# Altium PCB Hexapod_PCB.PcbDoc (part 1 of 2)
Units mm, origin at the board's own origin, x right, y up, seen from the top; angles counter-clockwise.
Board outline 100 x 100 mm, 4 copper layers (Top Layer, GND Layer, PWR Layer, Bottom Layer), stack 1.483 mm thick; 251 components, 159 nets, 831 pads, 257 vias.
Unrouted connection lines stored in the file: 253.
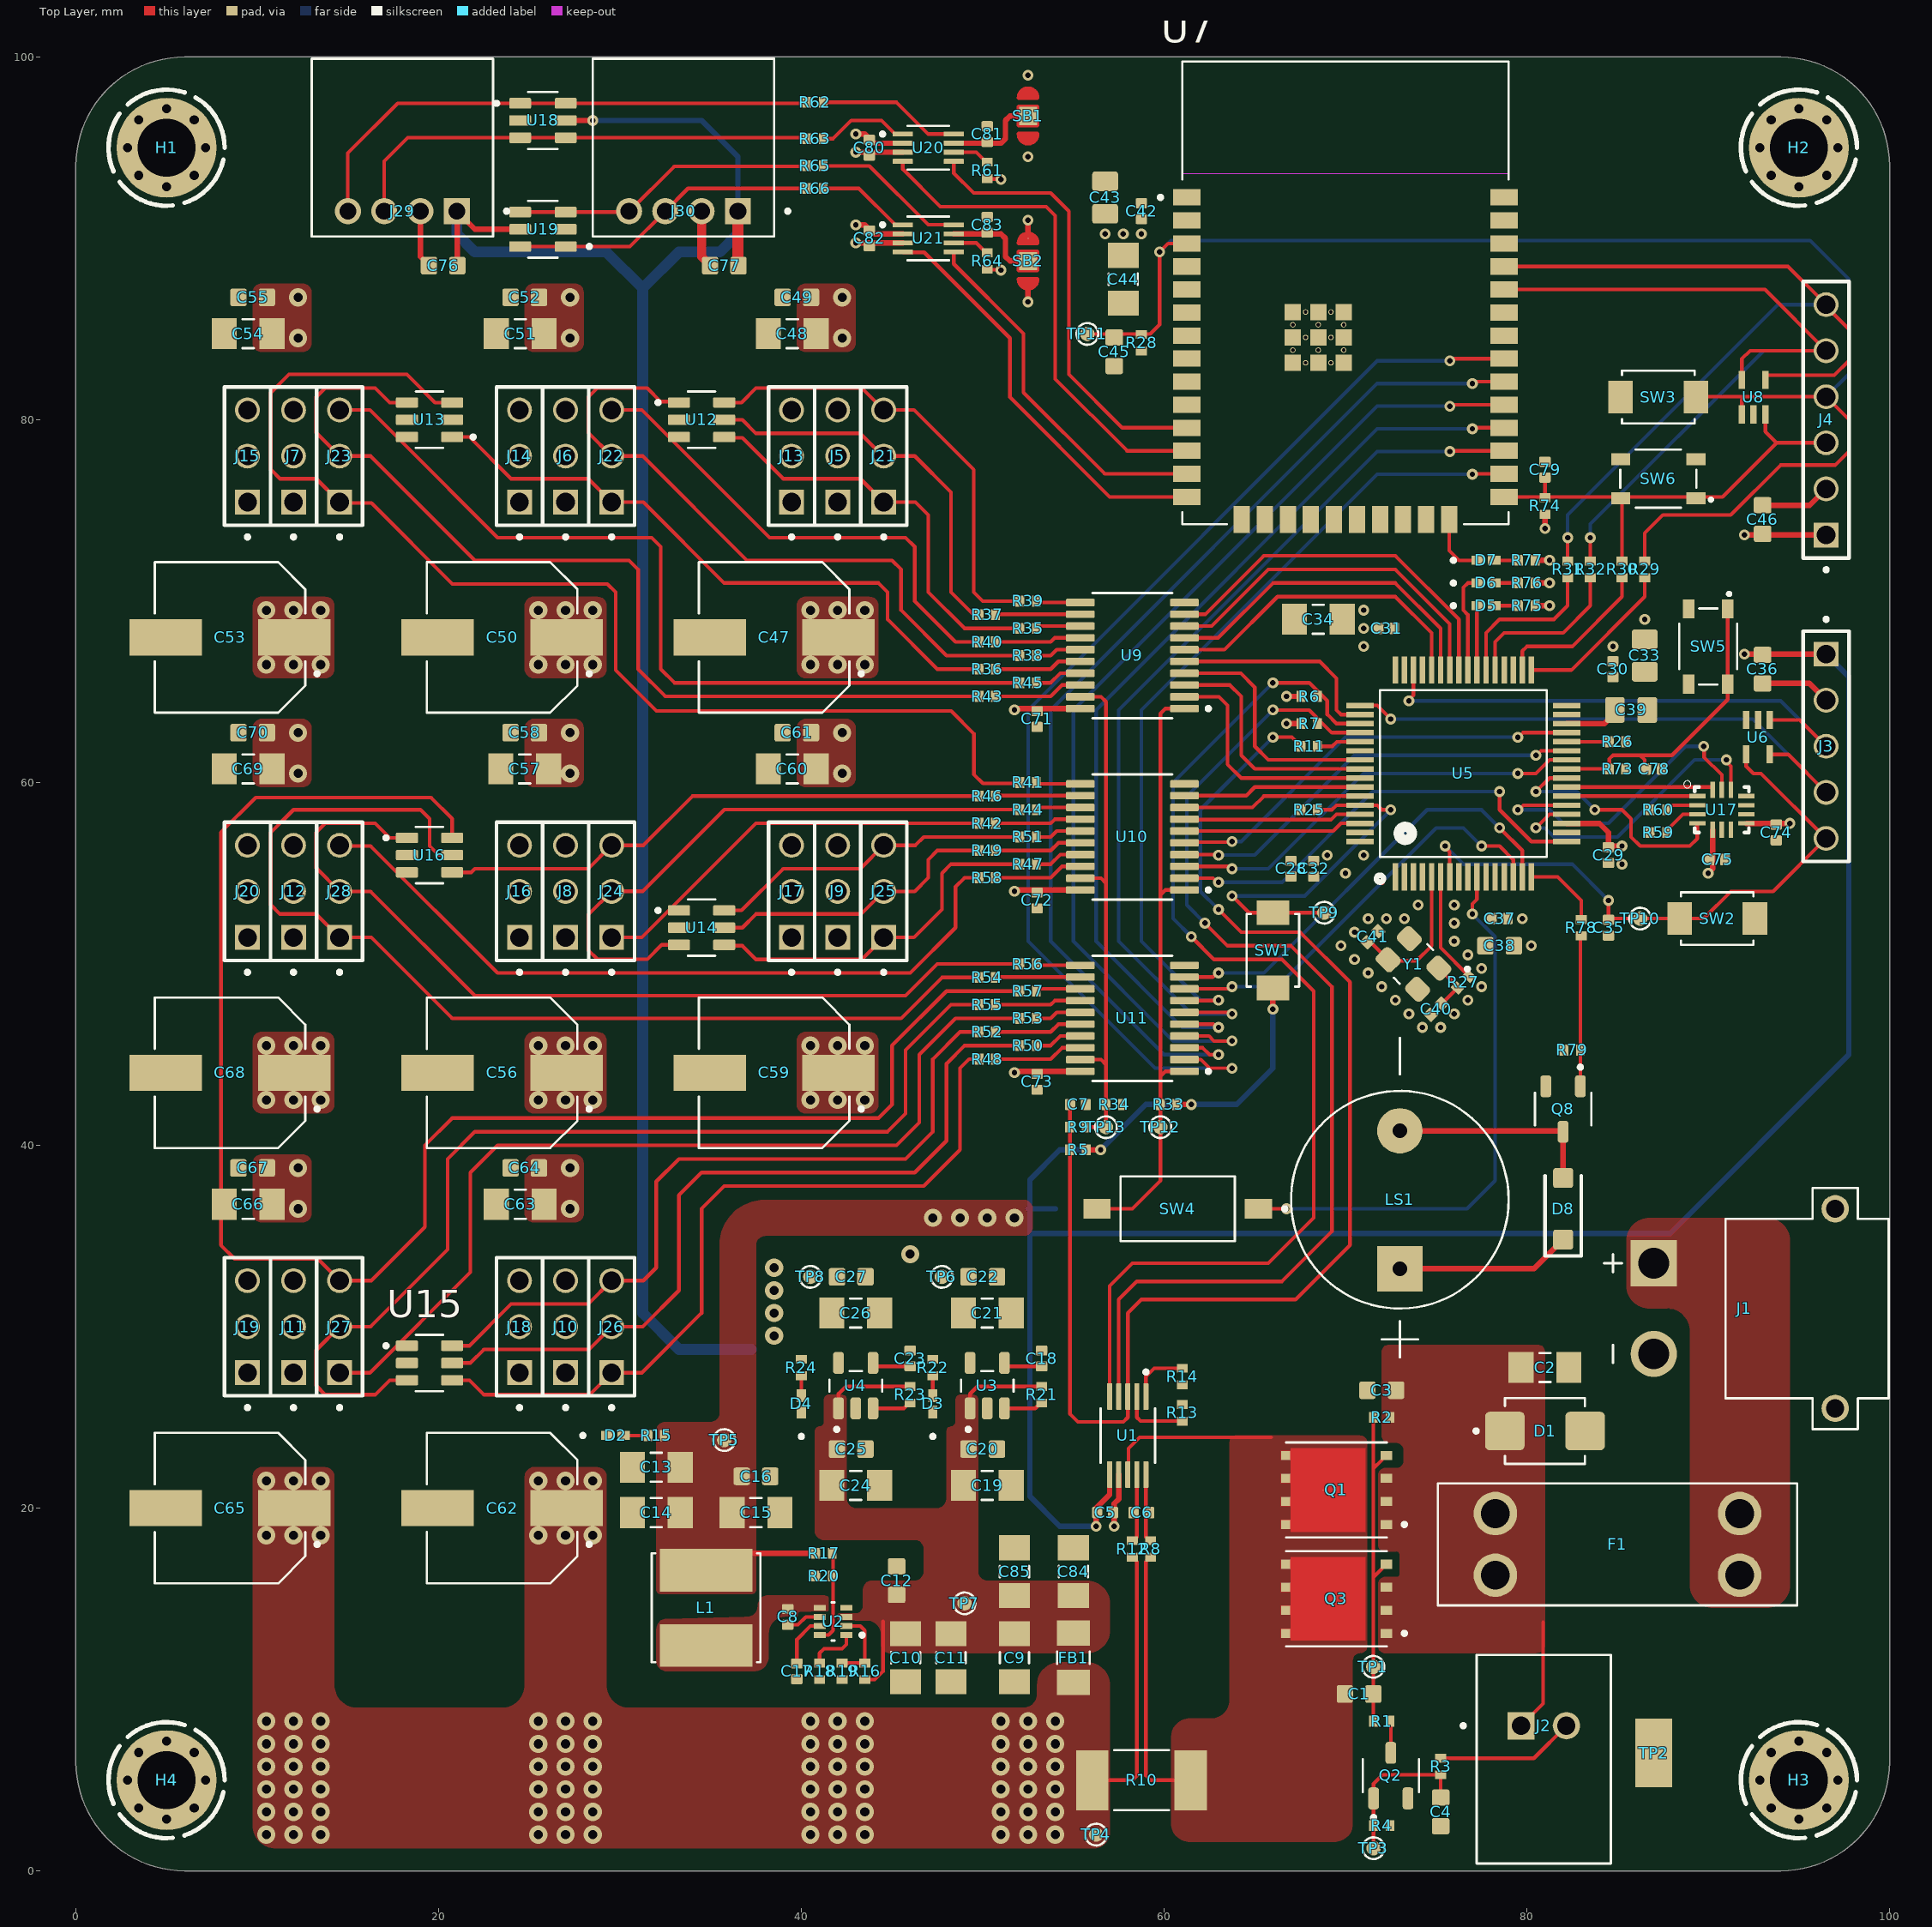
[diagram p0: Top Layer view]
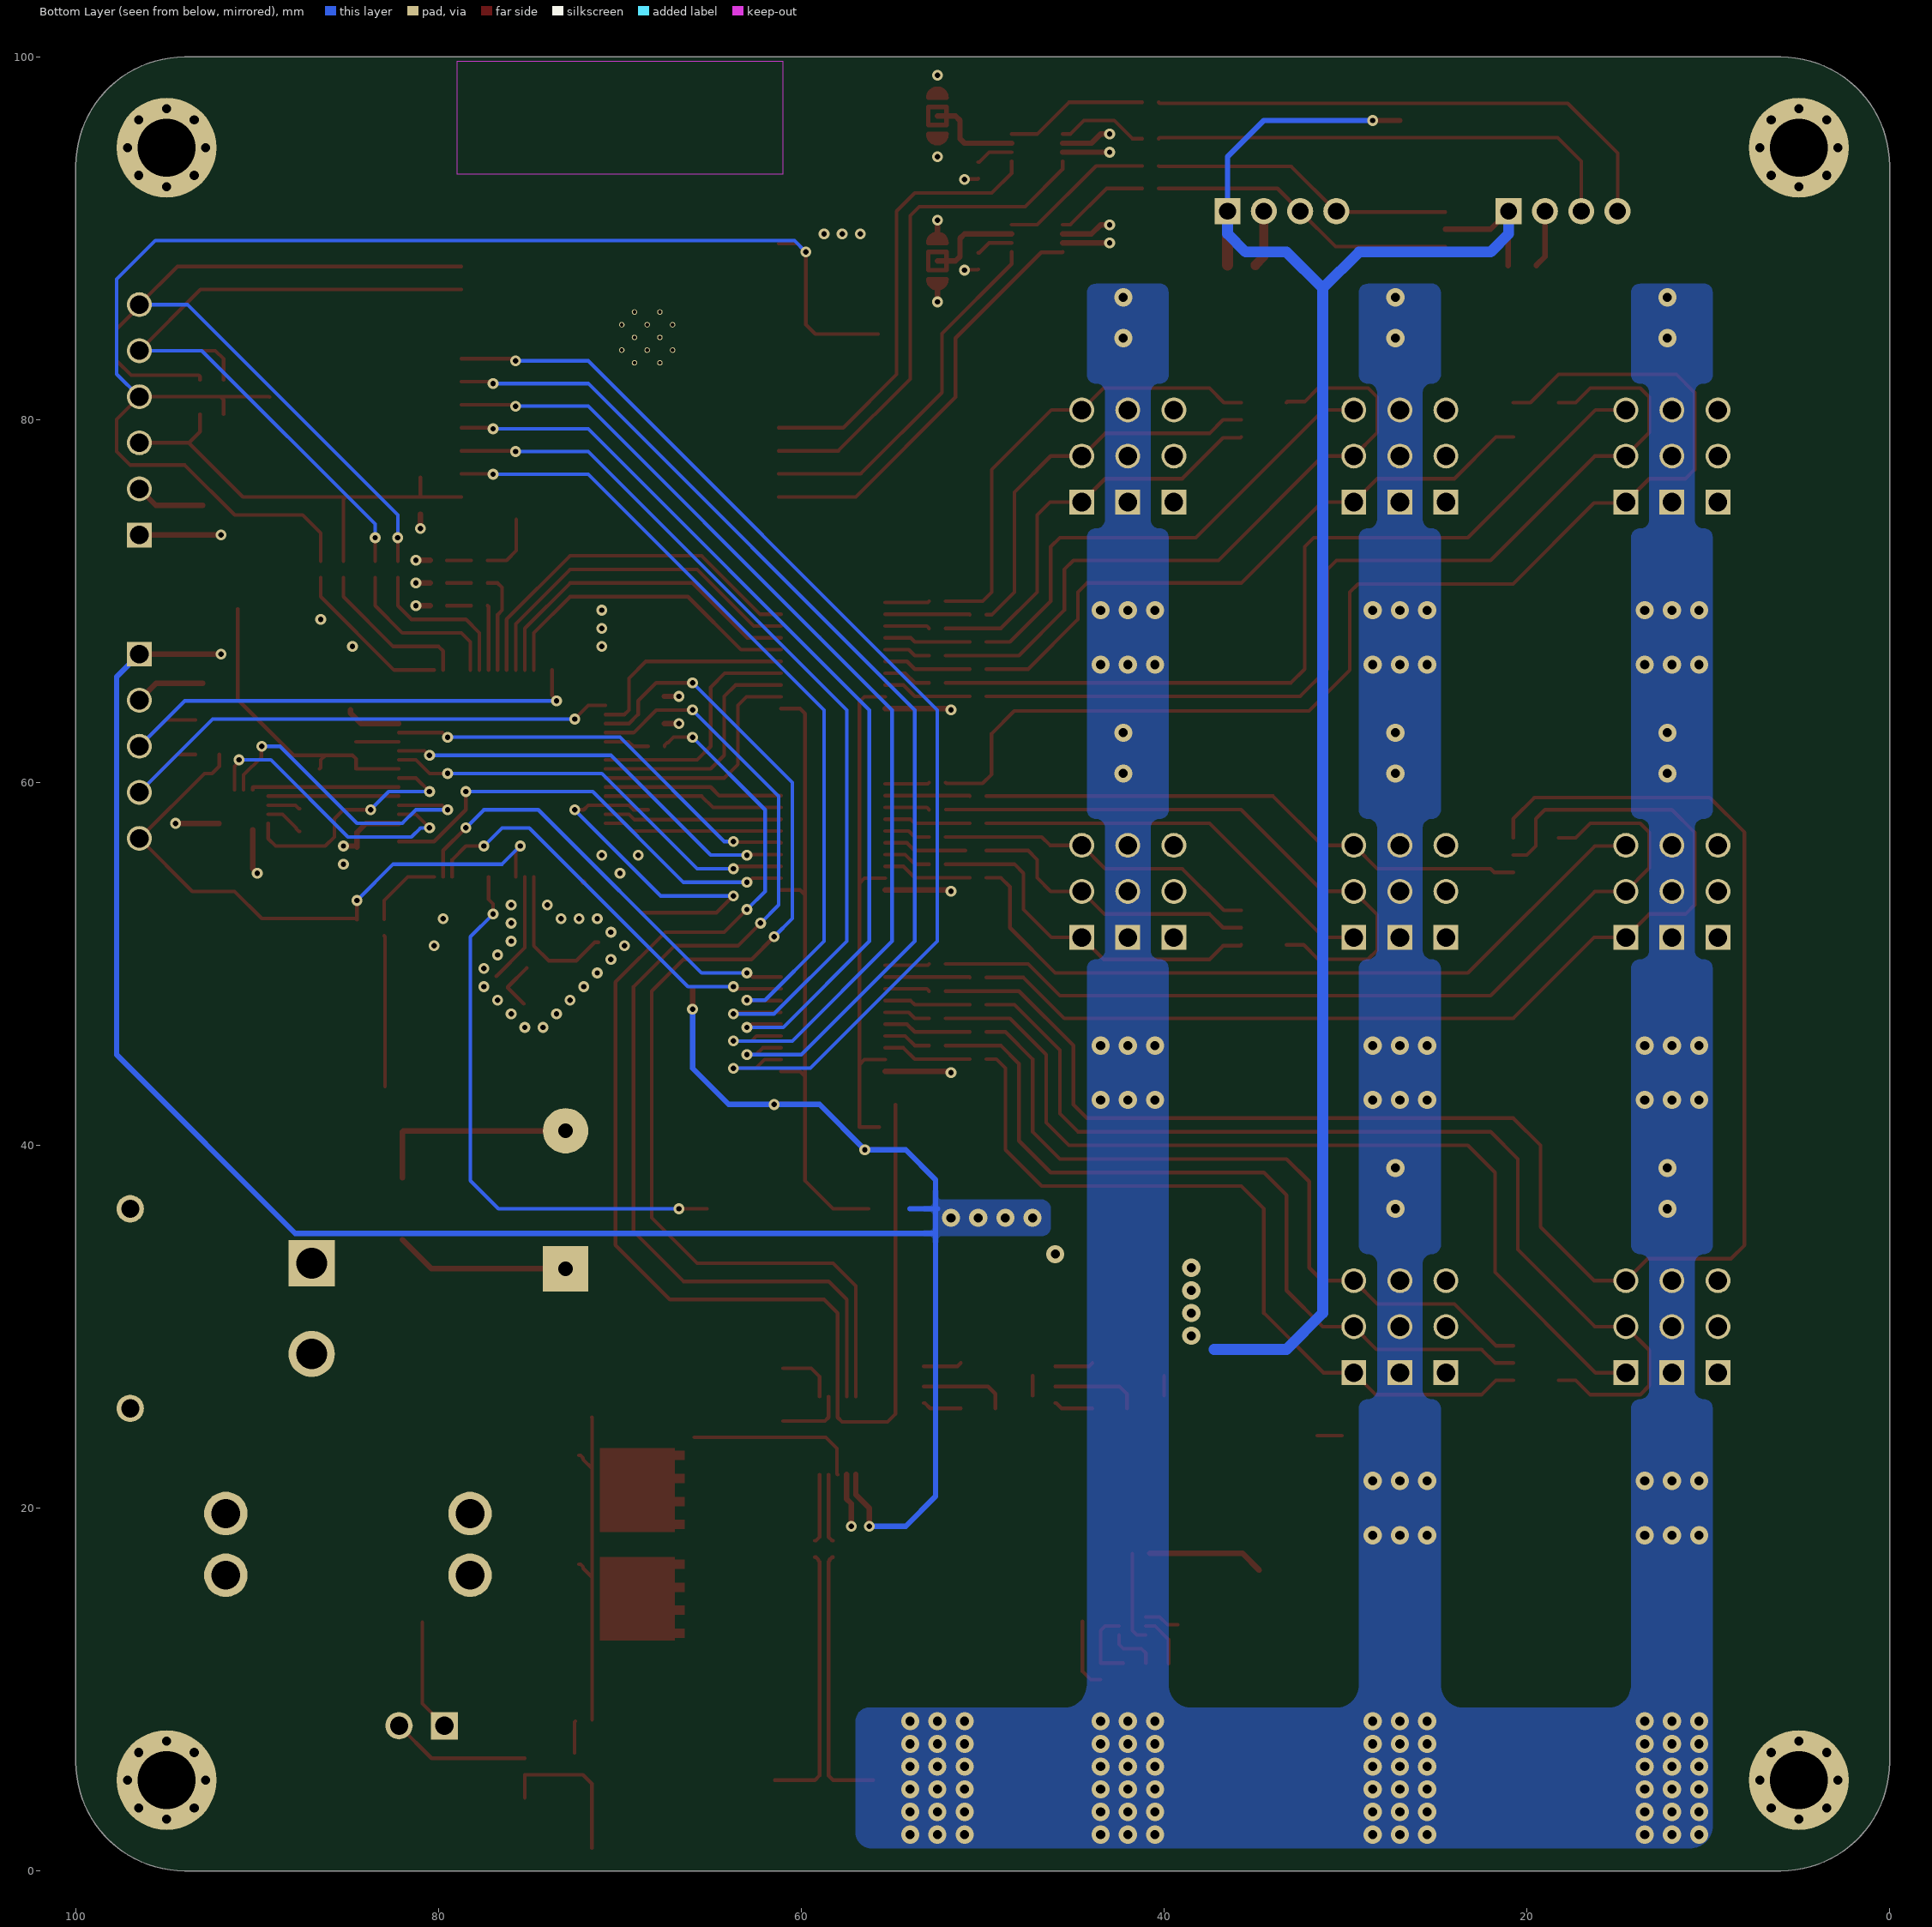
[diagram p1: Bottom Layer view, seen from below]
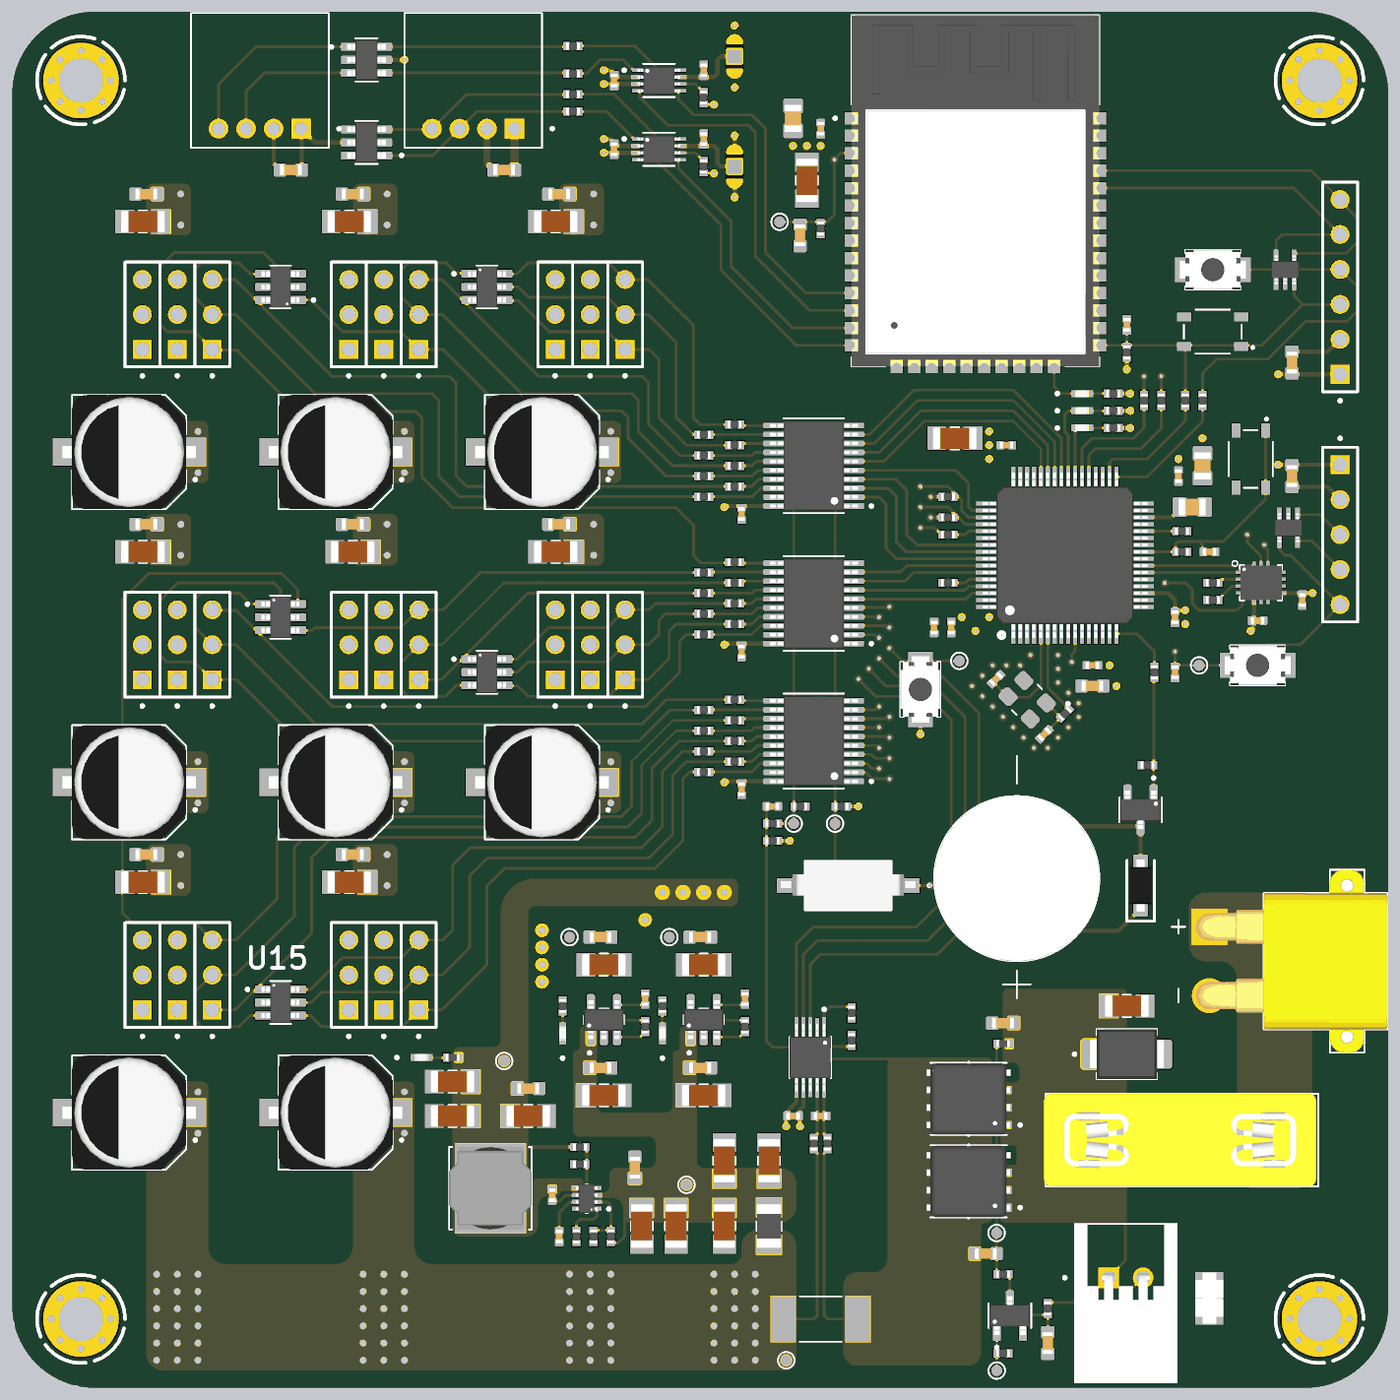
[diagram p3: 3D render of the assembled board from above, using the file's embedded part models]

## Layer stack, top to bottom
Top Solder: solder mask 0.0102, Solder Resist, Dk 3.5
Top Layer: signal copper 0.0356
Dielectric 2: prepreg 0.0711, PP-006, Dk 4.1
GND Layer: signal copper 0.035
Dielectric 1: dielectric 1.2, FR-4, Dk 4.8
PWR Layer: signal copper 0.035
Dielectric 3: prepreg 0.0711, PP-006, Dk 4.1
Bottom Layer: signal copper 0.0356
Bottom Solder: solder mask 0.0102, Solder Resist, Dk 3.5

## Board outline
0,6 0,94 cw(c6,94) 6,100 94,100 cw(c94,94) 100,94 100,6 cw(c94,6) 94,0 6,0 cw(c6,6)

## Design rules (kind name [scope] priority, off if disabled: settings)
Clearance [All] p1: gap=0.15 ignorepadtopadclearanceinfootprint=FALSE
DiffPairsRouting Diff_Sense [InDifferentialPair('SENSE')] p1: maxlimit=0.15 minlimit=0.15 mostfreqgap=0.15 toplayer_minwidth=0.2 toplayer_maxwidth=0.2 toplayer_prefwidth=0.2 midlayer1_minwidth=0.2 midlayer1_maxwidth=0.2 midlayer1_prefwidth=0.2 midlayer2_minwidth=0.2 midlayer2_maxwidth=0.2 midlayer2_prefwidth=0.2 bottomlayer_minwidth=0.2 bottomlayer_maxwidth=0.2 bottomlayer_prefwidth=0.2 maxuncoupledlength=5
DiffPairsRouting [All] p2: maxlimit=0.254 minlimit=0.254 mostfreqgap=0.254 toplayer_minwidth=0.381 toplayer_maxwidth=0.381 toplayer_prefwidth=0.381 midlayer1_minwidth=0.381 midlayer1_maxwidth=0.381 midlayer1_prefwidth=0.381 midlayer2_minwidth=0.381 midlayer2_maxwidth=0.381 midlayer2_prefwidth=0.381 bottomlayer_minwidth=0.381 bottomlayer_maxwidth=0.381 bottomlayer_prefwidth=0.381 maxuncoupledlength=12.7
PlaneConnect [All] p1: planeconnectstyle=Direct reliefexpansion=0.508 reliefentries=4 reliefconductorwidth=0.254 reliefairgap=0.254
PolygonConnect [All] p1: connectstyle=Direct reliefconductorwidth=0.254 reliefentries=4 polygonreliefangle="90 Angle" airgapwidth=0.254
RoutingVias RoutingVias_PWR [InNetClass('PWR')] p1: holewidth=0.5 width=1 viastyle="Through Hole" minholewidth=0.5 minwidth=1 maxholewidth=0.5 maxwidth=1
RoutingVias [All] p2: holewidth=0.3 width=0.6 viastyle="Through Hole" minholewidth=0.3 minwidth=0.6 maxholewidth=0.3 maxwidth=0.6
SilkToSolderMaskClearance [IsPad] p1: minsilkscreentomaskgap=0.1 clearancetoexposedcopper=TRUE
SolderMaskExpansion [All] p1: expansion=0.05 istentingtop=FALSE
SupplyNets "Schematic Supply Nets_7" [InNet('+3V3')] p1: voltage=0.000
SupplyNets "Schematic Supply Nets_6" [InNet('+VBAT_SW')] p2: voltage=0.000
SupplyNets "Schematic Supply Nets_5" [InNet('+VBAT_LOGIC')] p3: voltage=0.000
SupplyNets "Schematic Supply Nets_4" [InNet('+5V_INT')] p4: voltage=0.000
SupplyNets "Schematic Supply Nets_3" [InNet('+VBAT_SYS')] p5: voltage=0.000
SupplyNets "Schematic Supply Nets_2" [InNet('+5V_EXT')] p6: voltage=0.000
SupplyNets "Schematic Supply Nets_1" [InNet('GND')] p7: voltage=0.000
SupplyNets "Schematic Supply Nets" [InNet('+VBAT_F')] p8: voltage=0.000
Width Width_PWR [InNetClass('PWR')] p1: maxlimit=5 minlimit=0.2 preferedwidth=1 minimp=50.000000 maximp=50.000000 favimp=50.000000
Width [InNetClass('All Nets')] p2: maxlimit=0.5 minlimit=0.15 preferedwidth=0.2
27 further rules are at their usual default settings.

## Classes and differential pairs
net class PWR: +3V3 +5V_EXT +5V_INT +VBAT_F +VBAT_SW NetF1_1
component class U_Servo_Signal_Ext: J21 J22 J23 J24 J25 J26 J27 J28 R35 R36 R37 R38 R39 R40 R41 R42 R43 R44 R45 R46 R47 R48 R49 R50 R51 R52 R53 R54 R55 R56 R57 R58 U12 U13 U14 U15 U16
component class U_Servo_Signal_Buf: C71 C72 C73 R33 R34 SW4 TP12 TP13 U9 U10 U11
component class U_Servo_Power: C47 C48 C49 C50 C51 C52 C53 C54 C55 C56 C57 C58 C59 C60 C61 C62 C63 C64 C65 C66 C67 C68 C69 C70 J5 J6 J7 J8 J9 J10 J11 J12 J13 J14 J15 J16 J17 J18 J19 J20
component class U_Serial_Interface_UART: C77 C82 C83 J30 R64 R65 R66 SB2 U19 U21
component class U_Serial_Interface_I2C: C76 C80 C81 J29 R61 R62 R63 SB1 U18 U20
component class U_Power_Input: C1 C2 C3 C4 C5 C6 C7 D1 F1 J1 J2 Q1 Q2 Q3 R1 R2 R3 R4 R5 R6 R7 R8 R9 R10 R11 R12 R13 R14 TP1 TP2 TP3 TP4 U1
component class U_Mechanical: H1 H2 H3 H4
component class U_MCU_STM: C28 C29 C30 C31 C32 C33 C34 C35 C36 C37 C38 C39 C40 C41 J3 R25 R26 R27 SW1 SW2 TP9 TP10 U5 U6 Y1
component class U_MCU_ESP: C42 C43 C44 C45 C46 J4 R28 R29 R30 R31 R32 SW3 TP11 U7 U8
component class U_Input: C78 C79 R73 R74 SW5 SW6
component class U_Indicator: D5 D6 D7 D8 LS1 Q8 R75 R76 R77 R78 R79
component class U_IMU: C74 C75 R59 R60 U17
component class U_Power_Regulators: C8 C9 C10 C11 C12 C13 C14 C15 C16 C17 C18 C19 C20 C21 C22 C23 C24 C25 C26 C27 C84 C85 D2 D3 D4 FB1 L1 R15 R16 R17 R18 R19 R20 R21 R22 R23 R24 TP5 TP6 TP7 TP8 U2 U3 U4

## Components (designator, comment, footprint, x,y, rotation, side; value= is the part's Value field where it differs from the comment)
C1 "N_P_CAP_0603" N_P_CAP_0603 70.75,9.75 r180 top value=330nF
C2 "N_P_CAP_1206" N_P_CAP_1206 81,27.75 r180 top value=10uF
C3 "N_P_CAP_0603" N_P_CAP_0603 72,26.5 r0 top value=100nF
C4 "N_P_CAP_0603" N_P_CAP_0603 75.25,3.25 r90 top value=100nF
C5 "N_P_CAP_0402" N_P_CAP_0402 56.75,19.75 r180 top value=100nF
C6 "N_P_CAP_0402" N_P_CAP_0402 58.75,19.75 r0 top value=100nF
C7 "N_P_CAP_0402" N_P_CAP_0402 55.25,42.25 r180 top value=100nF
C8 "N_P_CAP_0402" N_P_CAP_0402 39.25,14 r270 top value=100nF
C9 "N_P_CAP_1206" N_P_CAP_1206 51.75,11.75 r90 top value=22uF
C10 "N_P_CAP_1206" N_P_CAP_1206 45.75,11.75 r90 top value=10uF
C11 "N_P_CAP_1206" N_P_CAP_1206 48.25,11.75 r90 top value=10uF
C12 "N_P_CAP_0603" N_P_CAP_0603 45.25,16 r270 top value=100nF
C13 "N_P_CAP_1206" N_P_CAP_1206 32,22.25 r0 top value=22uF
C14 "N_P_CAP_1206" N_P_CAP_1206 32,19.75 r0 top value=22uF
C15 "N_P_CAP_1206" N_P_CAP_1206 37.5,19.75 r180 top value=22uF
C16 "N_P_CAP_0603" N_P_CAP_0603 37.5,21.75 r180 top value=100nF
C17 "N_P_CAP_0402" N_P_CAP_0402 39.75,11 r270 top value=33nF
C18 "N_P_CAP_0402" N_P_CAP_0402 53.25,28.25 r270 top value=10nF
C19 "N_P_CAP_1206" N_P_CAP_1206 50.25,21.25 r180 top value=10uF
C20 "N_P_CAP_0603" N_P_CAP_0603 50,23.25 r180 top value=100nF
C21 "N_P_CAP_1206" N_P_CAP_1206 50.25,30.75 r180 top value=10uF
C22 "N_P_CAP_0603" N_P_CAP_0603 50,32.75 r180 top value=100nF
C23 "N_P_CAP_0402" N_P_CAP_0402 46,28.25 r270 top value=10nF
C24 "N_P_CAP_1206" N_P_CAP_1206 43,21.25 r180 top value=10uF
C25 "N_P_CAP_0603" N_P_CAP_0603 42.75,23.25 r180 top value=100nF
C26 "N_P_CAP_1206" N_P_CAP_1206 43,30.75 r180 top value=10uF
C27 "N_P_CAP_0603" N_P_CAP_0603 42.75,32.75 r180 top value=100nF
C28 "N_P_CAP_0402" N_P_CAP_0402 67,55.25 r270 top value=100nF
C29 "N_P_CAP_0402" N_P_CAP_0402 84.5,56 r90 top value=100nF
C30 "N_P_CAP_0402" N_P_CAP_0402 84.75,66.25 r90 top value=100nF
C31 "N_P_CAP_0402" N_P_CAP_0402 72.25,68.5 r180 top value=100nF
C32 "N_P_CAP_0402" N_P_CAP_0402 68.25,55.25 r270 top value=100nF
C33 "N_P_CAP_0805" N_P_CAP_0805 86.5,67 r90 top value=4.7uF
C34 "N_P_CAP_1206" N_P_CAP_1206 68.5,69 r0 top value=22uF
C35 "N_P_CAP_0402" N_P_CAP_0402 84.5,52 r90 top value=100nF
C36 "N_P_CAP_0603" N_P_CAP_0603 93,66.25 r90 top value=100nF
C37 "N_P_CAP_0402" N_P_CAP_0402 78.5,52.5 r0 top value=100nF
C38 "N_P_CAP_0603" N_P_CAP_0603 78.5,51 r0 top value=1uF
C39 "N_P_CAP_0805" N_P_CAP_0805 85.75,64 r180 top value=4.7uF
C40 "N_P_CAP_0402" N_P_CAP_0402 75,47.5 r45 top value=20pF
C41 "N_P_CAP_0402" N_P_CAP_0402 71.5,51.5 r225 top value=20pF
C42 "N_P_CAP_0402" N_P_CAP_0402 58.75,91.5 r270 top value=100nF
C43 "N_P_CAP_0805" N_P_CAP_0805 56.75,92.25 r270 top value=4.7uF
C44 "N_P_CAP_1206" N_P_CAP_1206 57.75,87.75 r90 top value=22uF
C45 "N_P_CAP_0603" N_P_CAP_0603 57.25,83.75 r90 top value=1uF
C46 "N_P_CAP_0603" N_P_CAP_0603 93,74.5 r270 top value=100nF
C47 "P_CAP_8X10.2" P_CAP_8X10.2 38.5,68 r180 top value=470uF
C48 "N_P_CAP_1206" N_P_CAP_1206 39.5,84.75 r0 top value=10uF
C49 "N_P_CAP_0603" N_P_CAP_0603 39.75,86.75 r0 top value=100nF
C50 "P_CAP_8X10.2" P_CAP_8X10.2 23.5,68 r180 top value=470uF
C51 "N_P_CAP_1206" N_P_CAP_1206 24.5,84.75 r0 top value=10uF
C52 "N_P_CAP_0603" N_P_CAP_0603 24.75,86.75 r0 top value=100nF
C53 "P_CAP_8X10.2" P_CAP_8X10.2 8.5,68 r180 top value=470uF
C54 "N_P_CAP_1206" N_P_CAP_1206 9.5,84.75 r0 top value=10uF
C55 "N_P_CAP_0603" N_P_CAP_0603 9.75,86.75 r0 top value=100nF
C56 "P_CAP_8X10.2" P_CAP_8X10.2 23.5,44 r180 top value=470uF
C57 "N_P_CAP_1206" N_P_CAP_1206 24.75,60.75 r0 top value=10uF
C58 "N_P_CAP_0603" N_P_CAP_0603 24.75,62.75 r0 top value=100nF
C59 "P_CAP_8X10.2" P_CAP_8X10.2 38.5,44 r180 top value=470uF
C60 "N_P_CAP_1206" N_P_CAP_1206 39.5,60.75 r0 top value=10uF
C61 "N_P_CAP_0603" N_P_CAP_0603 39.75,62.75 r0 top value=100nF
C62 "P_CAP_8X10.2" P_CAP_8X10.2 23.5,20 r180 top value=470uF
C63 "N_P_CAP_1206" N_P_CAP_1206 24.5,36.75 r0 top value=10uF
C64 "N_P_CAP_0603" N_P_CAP_0603 24.75,38.75 r0 top value=100nF
C65 "P_CAP_8X10.2" P_CAP_8X10.2 8.5,20 r180 top value=470uF
C66 "N_P_CAP_1206" N_P_CAP_1206 9.5,36.75 r0 top value=10uF
C67 "N_P_CAP_0603" N_P_CAP_0603 9.75,38.75 r0 top value=100nF
C68 "P_CAP_8X10.2" P_CAP_8X10.2 8.5,44 r180 top locked value=470uF
C69 "N_P_CAP_1206" N_P_CAP_1206 9.5,60.75 r0 top value=10uF
C70 "N_P_CAP_0603" N_P_CAP_0603 9.75,62.75 r0 top value=100nF
C71 "N_P_CAP_0402" N_P_CAP_0402 53,63.5 r90 top value=100nF
C72 "N_P_CAP_0402" N_P_CAP_0402 53,53.5 r90 top value=100nF
C73 "N_P_CAP_0402" N_P_CAP_0402 53,43.5 r90 top value=100nF
C74 "N_P_CAP_0402" N_P_CAP_0402 93.75,57.25 r90 top value=100nF
C75 "N_P_CAP_0402" N_P_CAP_0402 90.5,55.75 r180 top value=100nF
C76 "N_P_CAP_0603" N_P_CAP_0603 20.25,88.5 r0 top value=100nF
C77 "N_P_CAP_0603" N_P_CAP_0603 35.75,88.5 r0 top value=100nF
C78 "N_P_CAP_0402" N_P_CAP_0402 87,60.75 r180 top value=100nF
C79 "N_P_CAP_0402" N_P_CAP_0402 81,77.25 r270 top value=100nF
C80 "N_P_CAP_0402" N_P_CAP_0402 43.75,95 r270 top value=100nF
C81 "N_P_CAP_0402" N_P_CAP_0402 50.25,95.75 r270 top value=100nF
C82 "N_P_CAP_0402" N_P_CAP_0402 43.75,90 r270 top value=100nF
C83 "N_P_CAP_0402" N_P_CAP_0402 50.25,90.75 r270 top value=100nF
C84 "N_P_CAP_1206" N_P_CAP_1206 55,16.5 r270 top value=22uF
C85 "N_P_CAP_1206" N_P_CAP_1206 51.75,16.5 r270 top value=22uF
D1 "DO-214AA" DO-214AA 81,24.25 r0 top
D2 "LED_0402" LED_0402 29.75,24 r0 top
D3 "LED_0402" LED_0402 47.25,25.75 r90 top
D4 "LED_0402" LED_0402 40,25.75 r90 top
D5 "LED_0402" LED_0402 77.75,69.75 r0 top
D6 "LED_0402" LED_0402 77.75,71 r0 top
D7 "LED_0402" LED_0402 77.75,72.25 r0 top
D8 "SOD-123F" SOD-123F 82,36.5 r90 top
F1 "FUSE_HOLDER_3557-20" FUSE_HOLDER_3557-20 85,18 r180 top
FB1 "FB_1206" FB_1206 55,11.75 r90 top value=120Ω@100MHz
H1 "MOUNTING_HOLE_M3" MOUNTING_HOLE_M3 5,95 r0 top
H2 "MOUNTING_HOLE_M3" MOUNTING_HOLE_M3 95,95 r0 top
H3 "MOUNTING_HOLE_M3" MOUNTING_HOLE_M3 95,5 r0 top
H4 "MOUNTING_HOLE_M3" MOUNTING_HOLE_M3 5,5 r0 top
J1 "AMASS_XT30PW-M" AMASS_XT30PW-M 97,31 r270 top locked
J2 "CONN_JST_XH_1x02_P2.50mm_TH_RA" CONN_JST_XH_1x02_P2.50mm_TH_RA 80.932,8 r0 top locked
J3 "PIN_HEADER_1X5_2.54_VERTICAL" PIN_HEADER_1X5_2.54_VERTICAL 96.5,62 r90 top
J4 "PIN_HEADER_1X6_2.54_VERTICAL" PIN_HEADER_1X6_2.54_VERTICAL 96.5,80 r270 top
J5 "PIN_HEADER_1X3_2.54_VERTICAL" PIN_HEADER_1X3_2.54_VERTICAL 42,78 r270 top
J6 "PIN_HEADER_1X3_2.54_VERTICAL" PIN_HEADER_1X3_2.54_VERTICAL 27,78 r270 top
J7 "PIN_HEADER_1X3_2.54_VERTICAL" PIN_HEADER_1X3_2.54_VERTICAL 12,78 r270 top
J8 "PIN_HEADER_1X3_2.54_VERTICAL" PIN_HEADER_1X3_2.54_VERTICAL 27,54 r270 top
J9 "PIN_HEADER_1X3_2.54_VERTICAL" PIN_HEADER_1X3_2.54_VERTICAL 42,54 r270 top
J10 "PIN_HEADER_1X3_2.54_VERTICAL" PIN_HEADER_1X3_2.54_VERTICAL 27,30 r270 top
J11 "PIN_HEADER_1X3_2.54_VERTICAL" PIN_HEADER_1X3_2.54_VERTICAL 12,30 r270 top
J12 "PIN_HEADER_1X3_2.54_VERTICAL" PIN_HEADER_1X3_2.54_VERTICAL 12,54 r270 top
J13 "PIN_HEADER_1X3_2.54_VERTICAL" PIN_HEADER_1X3_2.54_VERTICAL 39.46,78 r270 top
J14 "PIN_HEADER_1X3_2.54_VERTICAL" PIN_HEADER_1X3_2.54_VERTICAL 24.46,78 r270 top
J15 "PIN_HEADER_1X3_2.54_VERTICAL" PIN_HEADER_1X3_2.54_VERTICAL 9.46,78 r270 top
J16 "PIN_HEADER_1X3_2.54_VERTICAL" PIN_HEADER_1X3_2.54_VERTICAL 24.46,54 r270 top
J17 "PIN_HEADER_1X3_2.54_VERTICAL" PIN_HEADER_1X3_2.54_VERTICAL 39.46,54 r270 top
J18 "PIN_HEADER_1X3_2.54_VERTICAL" PIN_HEADER_1X3_2.54_VERTICAL 24.46,30 r270 top
J19 "PIN_HEADER_1X3_2.54_VERTICAL" PIN_HEADER_1X3_2.54_VERTICAL 9.46,30 r270 top
J20 "PIN_HEADER_1X3_2.54_VERTICAL" PIN_HEADER_1X3_2.54_VERTICAL 9.46,54 r270 top
J21 "PIN_HEADER_1X3_2.54_VERTICAL" PIN_HEADER_1X3_2.54_VERTICAL 44.54,78 r270 top
J22 "PIN_HEADER_1X3_2.54_VERTICAL" PIN_HEADER_1X3_2.54_VERTICAL 29.54,78 r270 top
J23 "PIN_HEADER_1X3_2.54_VERTICAL" PIN_HEADER_1X3_2.54_VERTICAL 14.54,78 r270 top
J24 "PIN_HEADER_1X3_2.54_VERTICAL" PIN_HEADER_1X3_2.54_VERTICAL 29.54,54 r270 top
J25 "PIN_HEADER_1X3_2.54_VERTICAL" PIN_HEADER_1X3_2.54_VERTICAL 44.54,54 r270 top
J26 "PIN_HEADER_1X3_2.54_VERTICAL" PIN_HEADER_1X3_2.54_VERTICAL 29.54,30 r270 top
J27 "PIN_HEADER_1X3_2.54_VERTICAL" PIN_HEADER_1X3_2.54_VERTICAL 14.54,30 r270 top
J28 "PIN_HEADER_1X3_2.54_VERTICAL" PIN_HEADER_1X3_2.54_VERTICAL 14.54,54 r270 top
J29 "CONN_HY2.0_1x04_P2.00mm_TH_RA" CONN_HY2.0_1x04_P2.00mm_TH_RA 18,95 r180 top
J30 "CONN_HY2.0_1x04_P2.00mm_TH_RA" CONN_HY2.0_1x04_P2.00mm_TH_RA 33.5,95 r180 top
L1 "INDUCTOR_SRN6045TA-3R3Y" INDUCTOR_SRN6045TA-3R3Y 34.75,14.5 r90 top value=3.3uH
LS1 "BUZ_THT_D12.0_P7.6" BUZ_THT_D12.0_P7.6 73,37 r90 top locked
Q1 "DFN5X6" DFN5X6 69.5,21 r180 top locked
Q2 "SOT95P280X125-3N" SOT95P280X125-3N 72.5,5.25 r90 top
Q3 "DFN5X6" DFN5X6 69.5,15 r180 top locked
Q8 "SOT95P280X125-3N" SOT95P280X125-3N 82,42 r270 top
R1 "RES_0402" RES_0402 72,8.25 r0 top value=10kOhm
R2 "RES_0402" RES_0402 72,25 r180 top value=100kOhm
R3 "RES_0402" RES_0402 75.25,5.75 r270 top value=10kOhm
R4 "RES_0402" RES_0402 72,2.5 r0 top value=100kOhm
R5 "RES_0402" RES_0402 55.25,39.75 r0 top value=10kOhm
R6 "RES_0402" RES_0402 68,64.75 r180 top value=10kOhm
R7 "RES_0402" RES_0402 68,63.25 r180 top value=10kOhm
R8 "RES_0402" RES_0402 59.25,17.75 r270 top value=10Ohm
R9 "RES_0402" RES_0402 55.25,41 r180 top value=330Ohm
R10 "SHUNT_RES_2512" SHUNT_RES_2512 58.75,5 r0 top value=1mOhm
R11 "RES_0402" RES_0402 68,62 r0 top value=330Ohm
R12 "RES_0402" RES_0402 58.25,17.75 r270 top value=10Ohm
R13 "RES_0402" RES_0402 61,25.25 r90 top value=100kOhm
R14 "RES_0402" RES_0402 61,27.25 r270 top value=100kOhm
R15 "RES_0402" RES_0402 32,24 r0 top value=10kOhm
R16 "RES_0402" RES_0402 43.5,11 r270 top value=590kOhm
R17 "RES_0402" RES_0402 41.25,17.5 r180 top value=30.9kOhm
R18 "RES_0402" RES_0402 41,11 r90 top value=0Ohm
R19 "RES_0402" RES_0402 42.25,11 r90 top value=196kOhm
R20 "RES_0402" RES_0402 41.25,16.25 r0 top value=10kOhm
R21 "RES_0402" RES_0402 53.25,26.25 r270 top value=100kOhm
R22 "RES_0402" RES_0402 47.25,27.75 r90 top value=10kOhm
R23 "RES_0402" RES_0402 46,26.25 r270 top value=100kOhm
R24 "RES_0402" RES_0402 40,27.75 r90 top value=10kOhm
R25 "RES_0402" RES_0402 68,58.5 r180 top value=10kOhm
R26 "RES_0402" RES_0402 85,62.25 r0 top value=10kOhm
R27 "RES_0402" RES_0402 76.5,49 r45 top value=0Ohm
R28 "RES_0402" RES_0402 58.75,84.25 r90 top value=10kOhm
R29 "RES_0402" RES_0402 86.5,71.75 r270 top value=330Ohm
R30 "RES_0402" RES_0402 85.25,71.75 r90 top value=330Ohm
R31 "RES_0402" RES_0402 82.25,71.75 r270 top value=330Ohm
R32 "RES_0402" RES_0402 83.5,71.75 r270 top value=330Ohm
R33 "RES_0402" RES_0402 60.25,42.25 r180 top value=10kOhm
R34 "RES_0402" RES_0402 57.25,42.25 r0 top value=10kOhm
R35 "RES_0402" RES_0402 52.5,68.5 r0 top value=330Ohm
R36 "RES_0402" RES_0402 50.25,66.25 r0 top value=330Ohm
R37 "RES_0402" RES_0402 50.25,69.25 r0 top value=330Ohm
R38 "RES_0402" RES_0402 52.5,67 r0 top value=330Ohm
R39 "RES_0402" RES_0402 52.5,70 r0 top value=330Ohm
R40 "RES_0402" RES_0402 50.25,67.75 r0 top value=330Ohm
R41 "RES_0402" RES_0402 52.5,60 r0 top value=330Ohm
R42 "RES_0402" RES_0402 50.25,57.75 r0 top value=330Ohm
R43 "RES_0402" RES_0402 50.25,64.75 r0 top value=330Ohm
R44 "RES_0402" RES_0402 52.5,58.5 r0 top value=330Ohm
R45 "RES_0402" RES_0402 52.5,65.5 r0 top value=330Ohm
R46 "RES_0402" RES_0402 50.25,59.25 r0 top value=330Ohm
R47 "RES_0402" RES_0402 52.5,55.5 r0 top value=330Ohm
R48 "RES_0402" RES_0402 50.25,44.75 r0 top value=330Ohm
R49 "RES_0402" RES_0402 50.25,56.25 r0 top value=330Ohm
R50 "RES_0402" RES_0402 52.5,45.5 r0 top value=330Ohm
R51 "RES_0402" RES_0402 52.5,57 r0 top value=330Ohm
R52 "RES_0402" RES_0402 50.25,46.25 r0 top value=330Ohm
R53 "RES_0402" RES_0402 52.5,47 r0 top value=330Ohm
R54 "RES_0402" RES_0402 50.25,49.25 r0 top value=330Ohm
R55 "RES_0402" RES_0402 50.25,47.75 r0 top value=330Ohm
R56 "RES_0402" RES_0402 52.5,50 r0 top value=330Ohm
R57 "RES_0402" RES_0402 52.5,48.5 r0 top value=330Ohm
R58 "RES_0402" RES_0402 50.25,54.75 r0 top value=330Ohm
R59 "RES_0402" RES_0402 87.25,57.25 r180 top value=100kOhm
R60 "RES_0402" RES_0402 87.25,58.5 r180 top value=100kOhm
R61 "RES_0402" RES_0402 50.25,93.75 r90 top value=100kOhm
R62 "RES_0402" RES_0402 40.75,97.5 r180 top value=330Ohm
R63 "RES_0402" RES_0402 40.75,95.5 r0 top value=330Ohm
R64 "RES_0402" RES_0402 50.25,88.75 r90 top value=100kOhm
R65 "RES_0402" RES_0402 40.75,94 r180 top value=330Ohm
R66 "RES_0402" RES_0402 40.75,92.75 r180 top value=330Ohm
R73 "RES_0402" RES_0402 85,60.75 r180 top value=100kOhm
R74 "RES_0402" RES_0402 81,75.25 r90 top value=10kOhm
R75 "RES_0402" RES_0402 80,69.75 r180 top value=10kOhm
R76 "RES_0402" RES_0402 80,71 r180 top value=10kOhm
R77 "RES_0402" RES_0402 80,72.25 r180 top value=10kOhm
R78 "RES_0402" RES_0402 83,52 r90 top value=330Ohm
R79 "RES_0402" RES_0402 82.5,45.25 r0 top value=100kOhm
SB1 "SOLDERING_BRIDGE_3P" SOLDERING_BRIDGE_3P#1 52.5,96.75 r90 top
SB2 "SOLDERING_BRIDGE_3P" SOLDERING_BRIDGE_3P#2 52.5,88.75 r90 top
SW1 "SW_TS-1088-AR02016" SW_TS-1088-AR02016 66,50.75 r90 top
SW2 "SW_TS-1088-AR02016" SW_TS-1088-AR02016 90.5,52.5 r180 top
SW3 "SW_TS-1088-AR02016" SW_TS-1088-AR02016 87.25,81.25 r0 top
SW4 "SW_KAE01SGGT" SW_KAE01SGGT 60.75,36.5 r180 top
SW5 "SW_SKRPACE010" SW_SKRPACE010 90,67.5 r270 top
SW6 "SW_SKRPACE010" SW_SKRPACE010 87.25,76.75 r180 top
TP1 "TP_0.8MM" TP_0.8MM 71.535,11.25 r90 top
TP2 "TP_KEYSTONE_5019" TP_KEYSTONE_5019 87,6.5 r90 top
TP3 "TP_0.8MM" TP_0.8MM 71.55,1.25 r90 top
TP4 "TP_0.8MM" TP_0.8MM 56.25,2 r270 top
TP5 "TP_0.8MM" TP_0.8MM 35.75,23.75 r180 top
TP6 "TP_0.8MM" TP_0.8MM 47.75,32.75 r90 top
TP7 "TP_0.8MM" TP_0.8MM 49,14.75 r90 top
TP8 "TP_0.8MM" TP_0.8MM 40.5,32.75 r90 top
TP9 "TP_0.8MM" TP_0.8MM 68.825,52.825 r90 top
TP10 "TP_0.8MM" TP_0.8MM 86.25,52.5 r90 top
TP11 "TP_0.8MM" TP_0.8MM 55.767,84.733 r90 top
TP12 "TP_0.8MM" TP_0.8MM 59.795,41 r90 top
TP13 "TP_0.8MM" TP_0.8MM 56.795,41 r90 top
U1 "INA226AIDGSR" SOP50P490X110-10N 58,24 r270 top
U2 "TPS62933DRLR" SOTFL50P160X60-8N 41.75,13.75 r180 top
U3 "LP2985-50DBVR" SOT95P280X145-5N 50.25,26.75 r90 top
U4 "LP2985-50DBVR" SOT95P280X145-5N 43,26.75 r90 top
U5 "STM32F411RET6" QFP50P1200X1200X160-64N 76.5,60.5 r90 top locked
U6 "ESDALC6V1W5" SOT323-5L 92.75,62.5 r0 top
U7 "ESP32-WROOM-32E_(4MB)" XCVR_ESP32-WROOM-32E_(4MB) 70,87 r0 top
U8 "ESDALC6V1W5" SOT323-5L 92.5,81.25 r180 top
U9 "SN74AHCT541PWR" SOP65P640X120-20N 58.25,67 r180 top
U10 "SN74AHCT541PWR" SOP65P640X120-20N 58.25,57 r180 top
U11 "SN74AHCT541PWR" SOP65P640X120-20N 58.25,47 r180 top
U12 "SMS12CT1" SOT95P275X110-6N 34.5,80 r0 top
U13 "SMS12CT1" SOT95P275X110-6N 19.5,80 r180 top
U14 "SMS12CT1" SOT95P275X110-6N 34.5,52 r0 top
U15 "SMS12CT1" SOT95P275X110-6N 19.5,28 r0 top
U16 "SMS12CT1" SOT95P275X110-6N 19.5,56 r0 top
U17 "LSM6DS3TR-C" LGA-14-2.5X3MM 90.75,58.5 r0 top
U18 "USBLC6-2SC6" SOT95P280X145-6N 25.75,96.5 r0 top
U19 "USBLC6-2SC6" SOT95P280X145-6N 25.75,90.5 r180 top
U20 "TXS0102DCUR" SOP50P310X90-8N 47,95 r0 top
U21 "TXS0102DCUR" SOP50P310X90-8N 47,90 r0 top
Y1 "SMD3225-4P" SMD3225-4P 73.75,50 r135 top

## Footprints (in the part's own frame and the unit in brackets; to place one, negate y for a bottom-side part, rotate by r counter-clockwise, add the part's x,y. Pads: shape width x height; smd on the part's side, far side on the other; paste and mask are expansions set on the pad)
AMASS_XT30PW-M [mm]
  rect 2.55x2.55 / inner round 2.55 / far side rect 2.55x2.55 hole 1.7: 1(-2.5,-10)
  round 2.55 hole 1.7: 2(2.5,-10)
  round 1.508 hole 1: 3(-5.5,0) 4(5.5,0)
  silkscreen extent -6.65,-12.75 6.65,2.95, body extent -6.65,-11 6.65,2.95, height 5
BUZ_THT_D12.0_P7.6 [mm]
  round 2.5 hole 0.8: N(3.8,0)
  rect 2.5x2.5 / inner round 2.5 / far side rect 2.5x2.5 hole 0.8: P(-3.8,0)
  silkscreen extent -8.69,-6 8.92,6, body extent -6,-6 6,6, height 9.51
CONN_HY2.0_1x04_P2.00mm_TH_RA [mm]
  rect 1.438x1.438 / inner round 1.438 / far side rect 1.438x1.438 hole 0.93: 1(-3,3.5)
  round 1.438 hole 0.93: 2(-1,3.5) 3(1,3.5) 4(3,3.5)
  silkscreen extent -5.85,-4.9 5,4.9
CONN_JST_XH_1x02_P2.50mm_TH_RA [mm]
  rect 1.508x1.508 / inner round 1.508 / far side rect 1.508x1.508 hole 1: 1(-1.25,0)
  round 1.508 hole 1: 2(1.25,0)
  silkscreen extent -4.54,-7.6 3.7,3.9, body extent -3.7,-7.6 3.7,3.9, height 6.1
DFN5X6 [mm] "PDFN5x6 / PDFN-8"
  rect 0.65x0.5 smd: 1(-2.755,1.905) 2(-2.755,0.635) 3(-2.755,-0.635) 4(-2.755,-1.905)
  round 0.025 smd: 5(0.735,0)
  rect 0.5x0.5 smd paste-1 mask+0: 5(2.794,-1.905) 6(2.794,-0.635) 7(2.794,0.635) 8(2.794,1.905)
  Top Layer region: 2.52,2.155 3.07,2.155 3.07,1.655 2.52,1.655 2.52,0.885 3.07,0.885 3.07,0.385 2.52,0.385 2.52,-0.385 3.07,-0.385 3.07,-0.885 2.52,-0.885 2.52,-1.655 3.07,-1.655 3.07,-2.155 2.52,-2.155 2.52,-2.3 -1.6,-2.3 -1.6,2.3 2.52,2.3
  silkscreen extent -3.85,-2.62 2.78,2.62, body extent -3.03,-2.75 3.03,2.75, height 0.95
DO-214AA [mm] "DO-214AA / SMB"
  rrect23% 2.18x2.12 smd paste+0 mask+0.102: 1(-2.215,0) 2(2.215,0)
  silkscreen extent -3.9,-1.81 2.2,1.81, body extent -2.7,-1.81 2.7,1.81, height 2.62
FB_1206 [mm] "3216 Metric"
  rect 1.4x1.82 smd: 1(-1.36,0) 2(1.36,0)
  silkscreen extent -0.34,-0.9 0.34,0.9, body extent -1.6,-0.9 1.6,0.9, height 1.61
FUSE_HOLDER_3557-20 [mm]
  round 2.4 hole 1.6: 1(-6.735,-1.7) 1(-6.735,1.7) 2(6.735,-1.7) 2(6.735,1.7)
  silkscreen extent -9.9,-3.36 9.9,3.36, body extent -9.78,-3.37 10.03,3.37, height 7.38
INDUCTOR_SRN6045TA-3R3Y [mm]
  rect 2.35x5.1 smd: 1(-2.075,0) 2(2.075,0)
  silkscreen extent -3,-3 3,3, body extent -3,-3 3,3, height 4.5
LED_0402 [mm]
  rect 0.7x0.5 smd mask+0.05: 1(-0.45,0) 2(0.45,0)
  silkscreen extent -1.9,-0.1 -1.7,0.1, body extent -0.5,-0.25 0.5,0.25, height 0.5
LGA-14-2.5X3MM [mm]
  rect 0.9x0.25 smd: 1(-1.35,0.75) 2(-1.35,0.25) 3(-1.35,-0.25) 4(-1.35,-0.75) 8(1.35,-0.75) 9(1.35,-0.25) 10(1.35,0.25) 11(1.35,0.75)
  rect 0.25x0.9 smd: 5(-0.5,-1.1) 6(0,-1.1) 7(0.5,-1.1) 12(0.5,1.1) 13(0,1.1) 14(-0.5,1.1)
  silkscreen extent -2.1,-1.25 1.5,1.6, body extent -1.5,-1.25 1.5,1.25, height 0.96
MOUNTING_HOLE_M3 [mm]
  round 0.5 hole 0.5: 1(-2.159,0) 1(-1.527,-1.527) 1(-1.527,1.527) 1(0,-2.159) 1(0,2.159) 1(1.527,-1.527) 1(1.527,1.527) 1(2.159,0)
  round 5.5 hole 3.2 mask-2539.97: 1(0,0)
  silkscreen extent -3.2,-3.2 3.2,3.2
N_P_CAP_0402 [mm]
  rrect25% 0.56x0.63 smd: 1(-0.435,0) 2(0.435,0)
  body extent -0.5,-0.25 0.5,0.25, height 0.6
N_P_CAP_0603 [mm]
  rrect25% 0.9x0.97 smd: 1(-0.785,0) 2(0.785,0)
  body extent -0.8,-0.4 0.8,0.4, height 0.95
N_P_CAP_0805 [mm]
  rrect25% 1.08x1.42 smd: 1(-0.895,0) 2(0.895,0)
  body extent -1,-0.63 1,0.63, height 1.4
N_P_CAP_1206 [mm]
  rect 1.38x1.71 smd: 1(-1.318,0) 2(1.318,0)
  silkscreen extent -0.31,-0.8 0.31,0.8, body extent -1.6,-0.8 1.6,0.8, height 1.8
P_CAP_8X10.2 [mm]
  rect 4x2 smd: 1(-3.55,0) 2(3.55,0)
  silkscreen extent -4.9,-4.15 4.15,4.15, body extent -4.85,-4.15 4.85,4.15, height 10.2
PIN_HEADER_1X3_2.54_VERTICAL [mm]
  rect 1.37x1.37 / inner round 1.37 / far side rect 1.37x1.37 hole 1.02: 1(2.54,0)
  round 1.37 hole 1.02: 2(0,0) 3(-2.54,0)
  silkscreen extent -3.81,-1.27 4.56,1.27
PIN_HEADER_1X5_2.54_VERTICAL [mm]
  rect 1.37x1.37 / inner round 1.37 / far side rect 1.37x1.37 hole 1.02: 1(5.08,0)
  round 1.37 hole 1.02: 2(2.54,0) 3(0,0) 4(-2.54,0) 5(-5.08,0)
  silkscreen extent -6.35,-1.27 7.1,1.27
PIN_HEADER_1X6_2.54_VERTICAL [mm]
  rect 1.37x1.37 / inner round 1.37 / far side rect 1.37x1.37 hole 1.02: 1(6.35,0)
  round 1.37 hole 1.02: 2(3.81,0) 3(1.27,0) 4(-1.27,0) 5(-3.81,0) 6(-6.35,0)
  silkscreen extent -7.62,-1.27 8.37,1.27
QFP50P1200X1200X160-64N [mm]
  rect 1.5x0.3 smd: 1(-5.7,3.75) 2(-5.7,3.25) 3(-5.7,2.75) 4(-5.7,2.25) 5(-5.7,1.75) 6(-5.7,1.25) 7(-5.7,0.75) 8(-5.7,0.25) 9(-5.7,-0.25) 10(-5.7,-0.75) 11(-5.7,-1.25) 12(-5.7,-1.75) 13(-5.7,-2.25) 14(-5.7,-2.75) 15(-5.7,-3.25) 16(-5.7,-3.75) 33(5.7,-3.75) 34(5.7,-3.25) 35(5.7,-2.75) 36(5.7,-2.25) 37(5.7,-1.75) 38(5.7,-1.25) 39(5.7,-0.75) 40(5.7,-0.25) 41(5.7,0.25) 42(5.7,0.75) 43(5.7,1.25) 44(5.7,1.75) 45(5.7,2.25) 46(5.7,2.75) 47(5.7,3.25) 48(5.7,3.75)
  rect 0.3x1.5 smd: 17(-3.75,-5.7) 18(-3.25,-5.7) 19(-2.75,-5.7) 20(-2.25,-5.7) 21(-1.75,-5.7) 22(-1.25,-5.7) 23(-0.75,-5.7) 24(-0.25,-5.7) 25(0.25,-5.7) 26(0.75,-5.7) 27(1.25,-5.7) 28(1.75,-5.7) 29(2.25,-5.7) 30(2.75,-5.7) 31(3.25,-5.7) 32(3.75,-5.7) 49(3.75,5.7) 50(3.25,5.7) 51(2.75,5.7) 52(2.25,5.7) 53(1.75,5.7) 54(1.25,5.7) 55(0.75,5.7) 56(0.25,5.7) 57(-0.25,5.7) 58(-0.75,5.7) 59(-1.25,5.7) 60(-1.75,5.7) 61(-2.25,5.7) 62(-2.75,5.7) 63(-3.25,5.7) 64(-3.75,5.7)
  silkscreen extent -6.08,-4.6 4.6,4.88, body extent -6,-6 6,6, height 1.6
RES_0402 [mm]
  rect 0.49x0.6 smd paste+0 mask+0.102: 1(-0.455,0) 2(0.455,0)
  body extent -0.5,-0.25 0.5,0.25, height 0.4
SHUNT_RES_2512 [mm] "6432 Metric"
  rect 1.78x3.31 smd: 1(-2.718,0) 2(2.718,0)
  silkscreen extent -1.51,-1.65 1.51,1.65
SMD3225-4P [mm] "OSCCC320X250X60N"
  rrect50% 1.21x1.06 smd: 1(-1.15,-0.825) 2(1.15,-0.825) 3(1.15,0.825) 4(-1.15,0.825)
  silkscreen extent -2.4,-2 0.23,1.31
SOD-123F [mm]
  rrect25% 1.1x1.1 smd: 1(-1.7,0) 2(1.7,0)
  silkscreen extent -2.6,-1 1.83,1, body extent -1.9,-0.8 1.9,0.8, height 1
SOLDERING_BRIDGE_3P#1 [mm]
  round 0.025 smd: 1(-1.25,0) 2(1.25,0)
  rect 1x1 smd: 3(0,0)
  Top Layer region: -1,-0.5 -1.217,-0.45 -1.391,-0.312 -1.487,-0.111 -1.487,0.111 -1.391,0.312 -1.217,0.45 -1,0.5 -1,0.5
  Top Layer region: 1,-0.5 1,0.5 1.217,0.45 1.391,0.312 1.487,0.111 1.487,-0.111 1.391,-0.312 1.217,-0.45 1,-0.5
  Top Layer lines w0.254: -1,0.5 ccw(c-1,0) -1,-0.5 -1,0.5 ; -0.5,0.5 -0.5,-0.5 0.5,-0.5 0.5,0.5 -0.5,0.5 ; 1,0.5 cw(c1,0) 1.25,-0.433 cw(c1,0) 1,-0.5 1,0 1,0.5
SOLDERING_BRIDGE_3P#2 [mm]
  round 0.025 smd: 1(-1.25,0) 2(1.25,0)
  rect 1x1 smd: 3(0,0)
  Top Layer region: -1,-0.5 -1.217,-0.45 -1.391,-0.312 -1.487,-0.111 -1.487,0.111 -1.391,0.312 -1.217,0.45 -1,0.5 -1,0.5
  Top Layer region: 1,-0.5 1,0.5 1.217,0.45 1.391,0.312 1.487,0.111 1.487,-0.111 1.391,-0.312 1.217,-0.45 1,-0.5
  Top Layer lines w0.254: -0.5,0 -0.5,-0.5 0,-0.5 0.5,-0.5 0.5,0 0.5,0.5 0,0.5 -0.5,0.5 -0.5,0 ; -0.5,0 -0.5,0 ; -1,0.5 ccw(c-1,0) -1,-0.5 -1,0.5 ; 1,0.5 cw(c1,0) 1.25,0.433 cw(c1,0) 1,-0.5 1,0 1,0.5
SOP50P310X90-8N [mm]
  rrect25% 1.12x0.27 smd: 1(-1.405,0.75) 2(-1.405,0.25) 3(-1.405,-0.25) 4(-1.405,-0.75) 5(1.405,-0.75) 6(1.405,-0.25) 7(1.405,0.25) 8(1.405,0.75)
  silkscreen extent -2.62,-1.2 1.15,1.2, body extent -1.55,-1 1.55,1, height 0.9
SOP50P490X110-10N [mm]
  rrect25% 1.47x0.28 smd: 1(-2.15,1) 2(-2.15,0.5) 3(-2.15,0) 4(-2.15,-0.5) 5(-2.15,-1) 6(2.15,-1) 7(2.15,-0.5) 8(2.15,0) 9(2.15,0.5) 10(2.15,1)
  silkscreen extent -3.6,-1.5 1.5,1.5, body extent -2.45,-1.5 2.45,1.5, height 1.1
SOP65P640X120-20N [mm]
  rrect25% 1.57x0.41 smd: 1(-2.87,2.925) 2(-2.87,2.275) 3(-2.87,1.625) 4(-2.87,0.975) 5(-2.87,0.325) 6(-2.87,-0.325) 7(-2.87,-0.975) 8(-2.87,-1.625) 9(-2.87,-2.275) 10(-2.87,-2.925) 11(2.87,-2.925) 12(2.87,-2.275) 13(2.87,-1.625) 14(2.87,-0.975) 15(2.87,-0.325) 16(2.87,0.325) 17(2.87,0.975) 18(2.87,1.625) 19(2.87,2.275) 20(2.87,2.925)
  silkscreen extent -4.29,-3.45 2.2,3.45, body extent -3.2,-3.25 3.2,3.25, height 1.2
SOT95P275X110-6N [mm]
  rrect25% 1.22x0.58 smd paste+0 mask+0.102: 1(-1.245,0.95) 2(-1.245,0) 3(-1.245,-0.95) 4(1.245,-0.95) 5(1.245,0) 6(1.245,0.95)
  silkscreen extent -2.5,-1.56 0.75,1.56, body extent -1.38,-1.5 1.38,1.5, height 1.1
SOT95P280X125-3N [mm] "SOT-23 / SOT-23-3"
  rrect50% 1.21x0.59 smd: 1(-1.255,0.95) 2(-1.255,-0.95) 3(1.255,0)
  silkscreen extent -2.41,-1.55 0.9,1.55, body extent -1.4,-1.45 1.4,1.45, height 1.25
SOT95P280X145-5N [mm] "SOT-23-5"
  rrect50% 1.21x0.59 smd paste+0 mask+0.102: 1(-1.255,0.95) 2(-1.255,0) 3(-1.255,-0.95) 4(1.255,-0.95) 5(1.255,0.95)
  silkscreen extent -2.51,-1.45 0.8,1.45, body extent -1.4,-1.45 1.4,1.45, height 1.45
SOT95P280X145-6N [mm]
  rrect25% 1.21x0.59 smd: 1(-1.255,0.95) 2(-1.255,0) 3(-1.255,-0.95) 4(1.255,-0.95) 5(1.255,0) 6(1.255,0.95)
  silkscreen extent -2.65,-1.57 0.81,1.57, body extent -1.4,-1.46 1.4,1.46, height 1.45
SOT323-5L [mm]
  rect 0.35x1 smd: 1(0.65,0.953) 2(-0.65,0.953) 3(-0.65,-0.947) 4(0.65,-0.947) GND(0,0.953)
  body extent -1,-1.05 1,1.05, height 1.1
SOTFL50P160X60-8N [mm]
  rect 0.66x0.32 smd mask+0.05: 1(-0.735,0.75) 2(-0.735,0.25) 3(-0.735,-0.25) 4(-0.735,-0.75) 5(0.735,-0.75) 6(0.735,-0.25) 7(0.735,0.25) 8(0.735,0.75)
  silkscreen extent -1.7,-1.05 0.09,1.05, body extent -0.8,-1.05 0.8,1.05, height 0.6
SW_KAE01SGGT [mm]
  rect 1.5x1.1 smd: 1(-4.45,0) 2(4.45,0)
  silkscreen extent -6.01,-1.79 3.15,1.79, body extent -4.9,-1.79 4.9,1.79, height 3.13
SW_SKRPACE010 [mm]
  rect 1.05x0.65 smd: 1(-2.075,1.075) 2(2.075,1.075) 3(-2.075,-1.075) 4(2.075,-1.075)
  silkscreen extent -3.01,-1.6 2.1,1.6
SW_TS-1088-AR02016 [mm]
  rect 1.35x1.8 smd: 1(-2.075,0) 2(2.075,0)
  silkscreen extent -2,-1.45 2,1.45, body extent -2.4,-1.45 2.4,1.45, height 2
TP_0.8MM [mm]
  round 0.8 smd: TP(0,0)
  silkscreen extent -0.6,-0.6 0.6,0.6
TP_KEYSTONE_5019 [mm]
  rect 3.8x2.03 smd: TP(0,0)
  body extent -1.91,-1.01 1.91,1.01, height 2.3
XCVR_ESP32-WROOM-32E_(4MB) [mm]
  rect 1.5x0.9 smd: 1(-8.75,5.26) 2(-8.75,3.99) 3(-8.75,2.72) 4(-8.75,1.45) 5(-8.75,0.18) 6(-8.75,-1.09) 7(-8.75,-2.36) 8(-8.75,-3.63) 9(-8.75,-4.9) 10(-8.75,-6.17) 11(-8.75,-7.44) 12(-8.75,-8.71) 13(-8.75,-9.98) 14(-8.75,-11.25) 25(8.75,-11.25) 26(8.75,-9.98) 27(8.75,-8.71) 28(8.75,-7.44) 29(8.75,-6.17) 30(8.75,-4.9) 31(8.75,-3.63) 32(8.75,-2.36) 33(8.75,-1.09) 34(8.75,0.18) 35(8.75,1.45) 36(8.75,2.72) 37(8.75,3.99) 38(8.75,5.26)
  rect 0.9x1.5 smd: 15(-5.715,-12.5) 16(-4.445,-12.5) 17(-3.175,-12.5) 18(-1.905,-12.5) 19(-0.635,-12.5) 20(0.635,-12.5) 21(1.905,-12.5) 22(3.175,-12.5) 23(4.445,-12.5) 24(5.715,-12.5)
  rect 0.9x0.9 smd: 39_1(-2.9,-1.06) 39_2(-1.5,-1.06) 39_3(-0.1,-1.06) 39_4(-2.9,-2.46) 39_5(-1.5,-2.46) 39_6(-0.1,-2.46) 39_7(-2.9,-3.86) 39_8(-1.5,-3.86) 39_9(-0.1,-3.86)
  round 0.3 hole 0.2 mask+0: 39_10(-2.2,-1.06) 39_11(-0.8,-1.06) 39_12(-2.9,-1.76) 39_13(-1.5,-1.76) 39_14(-0.1,-1.76) 39_15(-2.2,-2.46) 39_16(-0.8,-2.46) 39_17(-2.9,-3.16) 39_18(-1.5,-3.16) 39_19(-0.1,-3.16) 39_20(-2.2,-3.86) 39_21(-0.8,-3.86)
  Keep-Out Layer region: 9,6.56 -9,6.56 -9,12.75 9,12.75
  silkscreen extent -10.3,-12.75 9,12.75, body extent -9,-12.75 9,12.75, height 3.25

## Part data
C1: library part N_P_CAP, "GENERIC NON-POLARIZED CAP", LCSC Part Number=C107070, Rated Voltage=25V
C2 C10 C11 C19 C21 C24 C26 C48 C51 C54 C57 C60 C63 C66 C69: library part N_P_CAP, "GENERIC NON-POLARIZED CAP", LCSC Part Number=C100122, Rated Voltage=50V
C3 C4 C12 C16 C20 C22 C25 C27 C36 C46 C49 C52 C55 C58 C61 C64 C67 C70 C76 C77: library part N_P_CAP, "GENERIC NON-POLARIZED CAP", LCSC Part Number=C106221, Rated Voltage=50V
C5 C6 C7 C8 C28 C29 C30 C31 C32 C35 C37 C42 C71 C72 C73 C74 C75 C78 C79 C80 C81 C82 C83: library part N_P_CAP, "GENERIC NON-POLARIZED CAP", LCSC Part Number=C105883, Rated Voltage=25V, Temperature Coefficient=X7R
C9 C13 C14 C15 C34 C44 C84 C85: library part N_P_CAP, "GENERIC NON-POLARIZED CAP", LCSC Part Number=C90146, MPN=CL31A226KOHNNNE, Rated Voltage=16V, Tolerance=10%
C17: library part N_P_CAP, "GENERIC NON-POLARIZED CAP", LCSC Part Number=C723886, Rated Voltage=16V, Temperature Coefficient=X7R
C18 C23: library part N_P_CAP, "GENERIC NON-POLARIZED CAP", LCSC Part Number=C60133, Rated Voltage=50V
C33 C39 C43: library part N_P_CAP, "GENERIC NON-POLARIZED CAP", LCSC Part Number=C354262, Rated Voltage=25V
C38 C45: library part N_P_CAP, "GENERIC NON-POLARIZED CAP", LCSC Part Number=C106858, Rated Voltage=25V
C40 C41: library part N_P_CAP, "GENERIC NON-POLARIZED CAP", LCSC Part Number=C107000, Rated Voltage=50V, Temperature Coefficient=NP0
C47 C50 C53 C56 C59 C62 C65 C68: library part P_CAP, "GENERIC POLARIZED CAP", LCSC Part Number=C79121, Rated Voltage=16V
D1: library part TVS_DIODE_UNIDIRECTIONAL, "GENERIC TVS DIODE UNIDIRECTIONAL", LCSC Part Number=C224028, MPN=SMBJ8.0A, Direction Type=Unidirectional, Polarity=Unidirectional
D2 D3 D4 D5 D6 D7: library part LED, "GENERIC LED", Color=Red, LCSC Part Number=C25503345
D8: library part DIODE, "GENERIC DIODE", LCSC Part Number=C83528, MPN=1N4148W-7-F
F1: library part FUSE, "GENERIC FUSE", LCSC Part Number=C3205238
FB1: library part FB, "GENERIC FERRITE BEAD", Current Rating=6A, LCSC Part Number=C337884, MPN=BLM31KN121SN1L, DCR (Max)=9mOhm
H1 H2 H3 H4: library part MOUNTING_HOLE, "GENERIC MOUNTING HOLE"
J1: library part AMASS_PCB_CONNECTOR, "GENERIC AMASS PCB CONNECTOR", LCSC Part Number=C431092, MF=Amass
J2: library part CONN_2P, "GENERIC CONNECTOR 2P"
J3: library part PIN_HEADER_5P, "GENERIC PIN HEADER 5P"
J4: library part PIN_HEADER_6P, "GENERIC PIN HEADER 6P"
J5 J6 J7 J8 J9 J10 J11 J12 J13 J14 J15 J16 J17 J18 J19 J20 J21 J22 J23 J24 J25 J26 J27 J28: library part PIN_HEADER_3P, "GENERIC PIN HEADER 3P", LCSC Part Number=C5470076, MPN=10129378-903001BLF, MF=Amphenol
J29 J30: library part CONN_4P, "GENERIC CONNECTOR 4P", LCSC Part Number=C55381784
L1: library part INDUCTOR, "GENERIC INDUCTOR", Current Rating=5A, MPN=SRN6045TA-3R3Y, Tolerance=30%, Isat=7.8A, MF=BOURNS
LS1: library part BUZZER, "GENERIC BUZZER", LCSC Part Number=C96093, MPN=TMB12A05, SPL=85dB, Type="Active Buzzer"
Q1 Q3: library part PMOS_SOIC8, "GENERIC P-MOSFET SOIC8", LCSC Part Number=C13899, MPN=AON6407, Channel Type=P-Channel, Rds(on) (Max)=6mOhm@6V, Vgs(th)=2.6V
Q2 Q8: library part NMOS_GSD, "GENERIC N-MOSFET 1=G, 2=S, 3=D", LCSC Part Number=C20917, MPN=AO3400A, Channel Type=P-Channel
R1 R3 R5 R6 R7 R15 R20 R22 R24 R25 R26 R28 R33 R34 R74 R75 R76 R77: library part RES, "GENERIC RES", LCSC Part Number=C60490, Tolerance=1%
R2 R4 R13 R14 R21 R23 R59 R60 R61 R64 R73 R79: library part RES, "GENERIC RES", LCSC Part Number=C60491, Tolerance=1%
R8 R12: library part RES, "GENERIC RES", LCSC Part Number=C5455560, Tolerance=1%
R9 R11 R29 R30 R31 R32 R35 R36 R37 R38 R39 R40 R41 R42 R43 R44 R45 R46 R47 R48 R49 R50 R51 R52 R53 R54 R55 R56 R57 R58 R62 R63 R65 R66 R78: library part RES, "GENERIC RES", LCSC Part Number=C105875, MPN=RC0402FR-07330RL, Tolerance=1%
R10: library part SHUNT_RES, "GENERIC SHUNT RES", LCSC Part Number=C55591707, MPN=EB25R001P6FGT, Power Rating=6W, Tolerance=1%
R16: library part RES, "GENERIC RES", LCSC Part Number=C477764, Tolerance=1%
R17: library part RES, "GENERIC RES", LCSC Part Number=C852715, MPN=RT0402BRD0730K9L, Tolerance=0.1%
R18 R27: library part RES, "GENERIC RES", LCSC Part Number=C106231, Tolerance=1%
R19: library part RES, "GENERIC RES", LCSC Part Number=C852585, Tolerance=0.1%
SB1 SB2: "GENERIC SOLDERING BRIDGE 3P"
SW1 SW2 SW3: library part TACTILE_SWITCH_NO_SPST_2P, "GENERIC TACTILE SWITCH NO SPST 2P"
SW4: library part SW_DIP_SPST_1P, "GENERIC DIP SWITCH SPST 1 POLE", LCSC Part Number=C600988, MPN=DSIC01LS-P, MF="XKB Connection"
SW5 SW6: library part TACTILE_SWITCH_NO_SPST_4P, "GENERIC TACTILE SWITCH NO SPST 4P", LCSC Part Number=C139797, MPN=SKRPACE010, MF=ALPS
TP1 TP2 TP3 TP4 TP5 TP6 TP7 TP8 TP9 TP10 TP11 TP12 TP13: library part TEST_POINT, "GENERIC TEST POINT"
U1: "36V, 16-bit, ultra-precise i2c output current/voltage/power monitor w/alert", LCSC Part Number=C49851, Package="VSSOP-10 Texas Instruments", MF="Texas Instruments", MPN=INA226AIDGSR
U2: "3.8-V to 30-V, 3-A, 200-kHz to 2.2-MHz, low-IQ synchronous buck converter in SOT-583 package", LCSC Part Number=C3200405, Package="SOT-583 Texas Instruments", MF="Texas Instruments", MPN=TPS62933DRLR
U3 U4: "150-mA, 16-V, low-dropout voltage regulator with enable", LCSC Part Number=C74511, Package="SOT-23-5 Texas Instruments", MF="Texas Instruments", MPN=LP2985-50DBVR
U5: "ARM Cortex-M4 STM32F4 Microcontroller IC 32-Bit 100MHz 512KB (512K x 8) FLASH 64-LQFP (10x10)", LCSC Part Number=C94355, Package="LQFP-64 STMicroelectronics", MF=STMicroelectronics, MPN=STM32F411RET6
U6 U8: "Clamp Ipp Tvs Diode Surface Mount SOT-323-5", LCSC Part Number=C703691, Package="SOT-323 STMicroelectronics", MF=STMicroelectronics, MPN=ESDALC6V1W5
U7: "Bluetooth, WiFi 802.11b/g/n, Bluetooth v4.2 +EDR, Class 1, 2 and 3 Transceiver Module 2.4GHz ~ 2.5GHz Integrated, Trace Surface Mount", MPN="ESP32-WROOM-32E (4MB)", Package="SMD-44 Espressif Systems", MF="Espressif Systems"
U9 U10 U11: "Octal Buffers/Drivers With 3-State Outputs 20-TSSOP -40 to 125", DigiKey Part Number=296-1120-1-ND, LCSC Part Number=C50989, Package="TSSOP-20 Texas Instruments", MF="Texas Instruments", MPN=SN74AHCT541PWR
U12 U13 U14 U15 U16: "23V Clamp 15A (8/20µs) Ipp Tvs Diode Surface Mount SC-74", MP=onsemi, MPN=SMS12CT1
U17: "IMUs - Inertial Measurement Units iNEMO 6DoF inertial module, for entry level / mid-tier smart phones and Portable PC platforms", LCSC Part Number=C967633, MF=STMicroelectronics, MPN=LSM6DS3TR-C
U18 U19: "17V Clamp 5A (8/20Âµs) Ipp Tvs Diode Surface Mount SOT-23-6", LCSC Part Number=C7519, Package="SOT-23-6 STMicroelectronics", MF=STMicroelectronics, MPN=USBLC6-2SC6
U20 U21: "2-Bit Bidirectional Voltage-Level Shifter for Open-Drain and Push-Pull Application", Package="VSSOP-8 Texas Instruments", MF="Texas Instruments", MPN=TXS0102DCUR
Y1: library part XTAL_4P, "GENERIC PASSIVE CRYSTAL", Frequency=8MHz, LCSC Part Number=C2682775, MPN=X32258MOB4SI, MF="YXC Crystal Oscillators"

## Via types
v1: diameter 1, hole 0.5, Top Layer to Bottom Layer, tented both sides, 136 vias
v2: diameter 0.6, hole 0.3, Top Layer to Bottom Layer, tented both sides, 69 vias
v3: diameter 0.6, hole 0.3, Top Layer to Bottom Layer, 43 vias
v4: diameter 1, hole 0.5, Top Layer to Bottom Layer, 9 vias

## Nets (pads, with @x,y where several pads share a name; then routed paths per layer and width w, separated by ;. In a path a pad name is that pad's centre, name@x,y a point inside that pad or via, vN(x,y) a via of type N, cw(c..) or ccw(c..) an arc to the next point about the centre after c; other vN are vias at no path point)
+3V3: C5.2 C13.2 C14.2 C15.2 C16.2 C28.2 C29.2 C30.2 C31.2 C32.2 C33.2 C34.2 C36.2 C37.2 C38.2 C42.2 C43.2 C44.2 C46.2 C74.2 C75.2 C80.2 C82.2 J3.1 J4.1 L1.2 R5.2 R6.2 R7.2 R15.2 R17.2 R28.1 R33.1 R61.1 R64.1 R73.1 R74.1 R75.1 R76.1 R77.1 SB1.1 SB2.1 SW1.1 TP5.TP U1.6 U5.1 U5.13 U5.19 U5.32 U5.48 U5.64 U6.2 U7.2 U17.5 U17.8 U20.3 U21.3 | length 157.2
  Top Layer w0.2: R64.1@50.25,88.295 50.273,88.272 50.978,88.272 v3(51,88.25) ; R61.1@50.25,93.295 50.273,93.272 50.978,93.272 v3(51,93.25)
  Top Layer w0.3: L1.2@34.75,16.575 35.675,17.5 R17.2@40.795,17.5 ; v3(43,89.75) U21.3@45.595,89.75 ; v3(43,94.75) U20.3@45.595,94.75 ; v3(52.5,86.5) SB2.1@52.5,87.5 ; R5.2@55.705,39.75 v3(56.5,39.75) ; v3(56.25,19) 56.25,20 57,20.75 U1.6@57,21.85 ; R33.1@60.705,42.25 v3(61.5,42.25) ; v3(66,47.5) SW1.1@66,48.675 ; v2(66.75,63.25) R7.2@67.545,63.25 ; v2(66.75,64.75) R6.2@67.545,64.75 ; 72,54.5 72.014,54.5 ; R75.1@80.455,69.75 v3(81.25,69.75) ; R76.1@80.455,71 v3(81.25,71) ; R77.1@80.455,72.25 v3(81.25,72.25) ; v3(81,74) R74.1@81,74.795 ; U5.19@82.2,57.75 84,57.75 84.5,57.25 C29.2@84.5,56.435 84.5,56.5 v3(85.25,56.5) ; v3(90,55) 90.25,55.25 U17.5@90.25,57.4 ; v3(92,67.08) J3.1@96.5,67.08 ; v3(92,73.65) J4.1@96.5,73.65 ; U17.8@92.1,57.75 v3(94.5,57.75)
  Bottom Layer w0.3: 52.5,36.5 54,36.5 ; v3(56.25,19) 54.25,19 52.6,20.65 52.6,35.15 ; v3(66,47.5) 66,44.25 64,42.25 v3(61.5,42.25) 59,42.25 v3(56.5,39.75) 54.25,39.75 52.6,38.1 52.6,36.5 52.6,35.15 ; J3.1@96.5,67.08 97.75,65.83 97.75,45 87.9,35.15 52.6,35.15
  other v3: 80.25,51 79.75,52.5 71,67.5 71,68.5 71,69.5 52.5,94.5
  other v4: 47.25,36 48.75,36 50.25,36 51.75,36
+5V_EXT: C26.2 C27.2 C76.2 C77.2 J29.1 J30.1 R24.2 SB1.2 SB2.2 TP8.TP U4.5 U18.5 U19.5 | length 108
  Top Layer w0.3: J29.1@21,91.5 J29.1@21.035,91.465 ; C76.2@21.035,88.5 J29.1@21.035,91.465 ; U19.5@24.495,90.5 22,90.5 J29.1@21.035,91.465 ; U18.5@27.005,96.5 v3(28.5,96.5) ; SB2.2@52.5,90 v3(52.5,91)
  Top Layer w0.6: C77.2@36.5,88.535 J30.1@36.5,91.5
  Bottom Layer w0.3: v3(28.5,96.5) 34.5,96.5 36.5,94.5 J30.1@36.5,91.5
  Bottom Layer w0.6: J29.1@21,91.5 21,90.25 22,89.25 29.25,89.25 31.25,87.25 ; J30.1@36.5,91.5 36.5,90.25 35.5,89.25 33.25,89.25 31.25,87.25 ; 37.25,28.75 33.25,28.75 31.25,30.75 31.25,87.25
  other v3: 52.5,99
  other v4: 46,34
+5V_INT: C21.2 C22.2 C71.2 C72.2 C73.2 D8.1 LS1.P R22.2 TP6.TP U3.5 U9.20 U10.20 U11.20 | length 20.8
  Top Layer w0.3: v3(51.75,44) 51.75,44.075 U11.20@55.38,44.075 ; v3(51.75,54) 51.75,54.075 U10.20@55.38,54.075 ; v3(51.75,64) 51.75,64.075 U9.20@55.38,64.075 ; LS1.P@73,33.2 80.4,33.2 D8.1@82,34.8
+VBAT_F: C2.2 C3.2 D1.1 F1.2 J2.1 Q1.1 Q1.2 Q1.3 Q3.1 Q3.2 Q3.3 R2.1 | length 6.2
  Top Layer w0.2: J2.1@79.682,8 80.9,9.218 80.9,13.7
+VBAT_LOGIC: C9.2 C10.2 C11.2 C12.2 C19.2 C20.2 C24.2 C25.2 C84.2 C85.2 FB1.2 R16.2 R21.1 R23.1 TP7.TP U2.3 U3.1 U4.1 | length 13.8
  Top Layer w0.2: U4.1@42.05,25.495 42.05,26.3 42.455,26.705 R23.1@46,26.705 ; R16.2@43.5,10.545 44.045,10.545 44.5,11 44.5,13.75 ; U3.1@49.3,25.495 49.3,26.3 49.705,26.705 R21.1@53.25,26.705
+VBAT_SW: C1.2 Q1.5 Q1.6 Q1.7 Q1.8 Q3.5 Q3.6 Q3.7 Q3.8 R8.2 R10.2 U1.8 | length 24.3
  Top Layer w0.2: U1.8@58,21.85 58.04,21.89 58.04,23.29 58.65,23.9 65.9,23.9 ; R8.2@59.25,17.295 59.195,17.295 59.05,17.15 59.05,17.095 59,17.045 59,5.25 59.25,5 R10.2@61.468,5